# Altium PCB Driver.PcbDoc
Units mm, origin at the board's own origin, x right, y up, seen from the top; angles counter-clockwise.
Board outline 110.25 x 100.25 mm, 2 copper layers (Top Layer, Bottom Layer), stack 1.371 mm thick; 109 components, 30 nets, 264 pads, 40 vias.
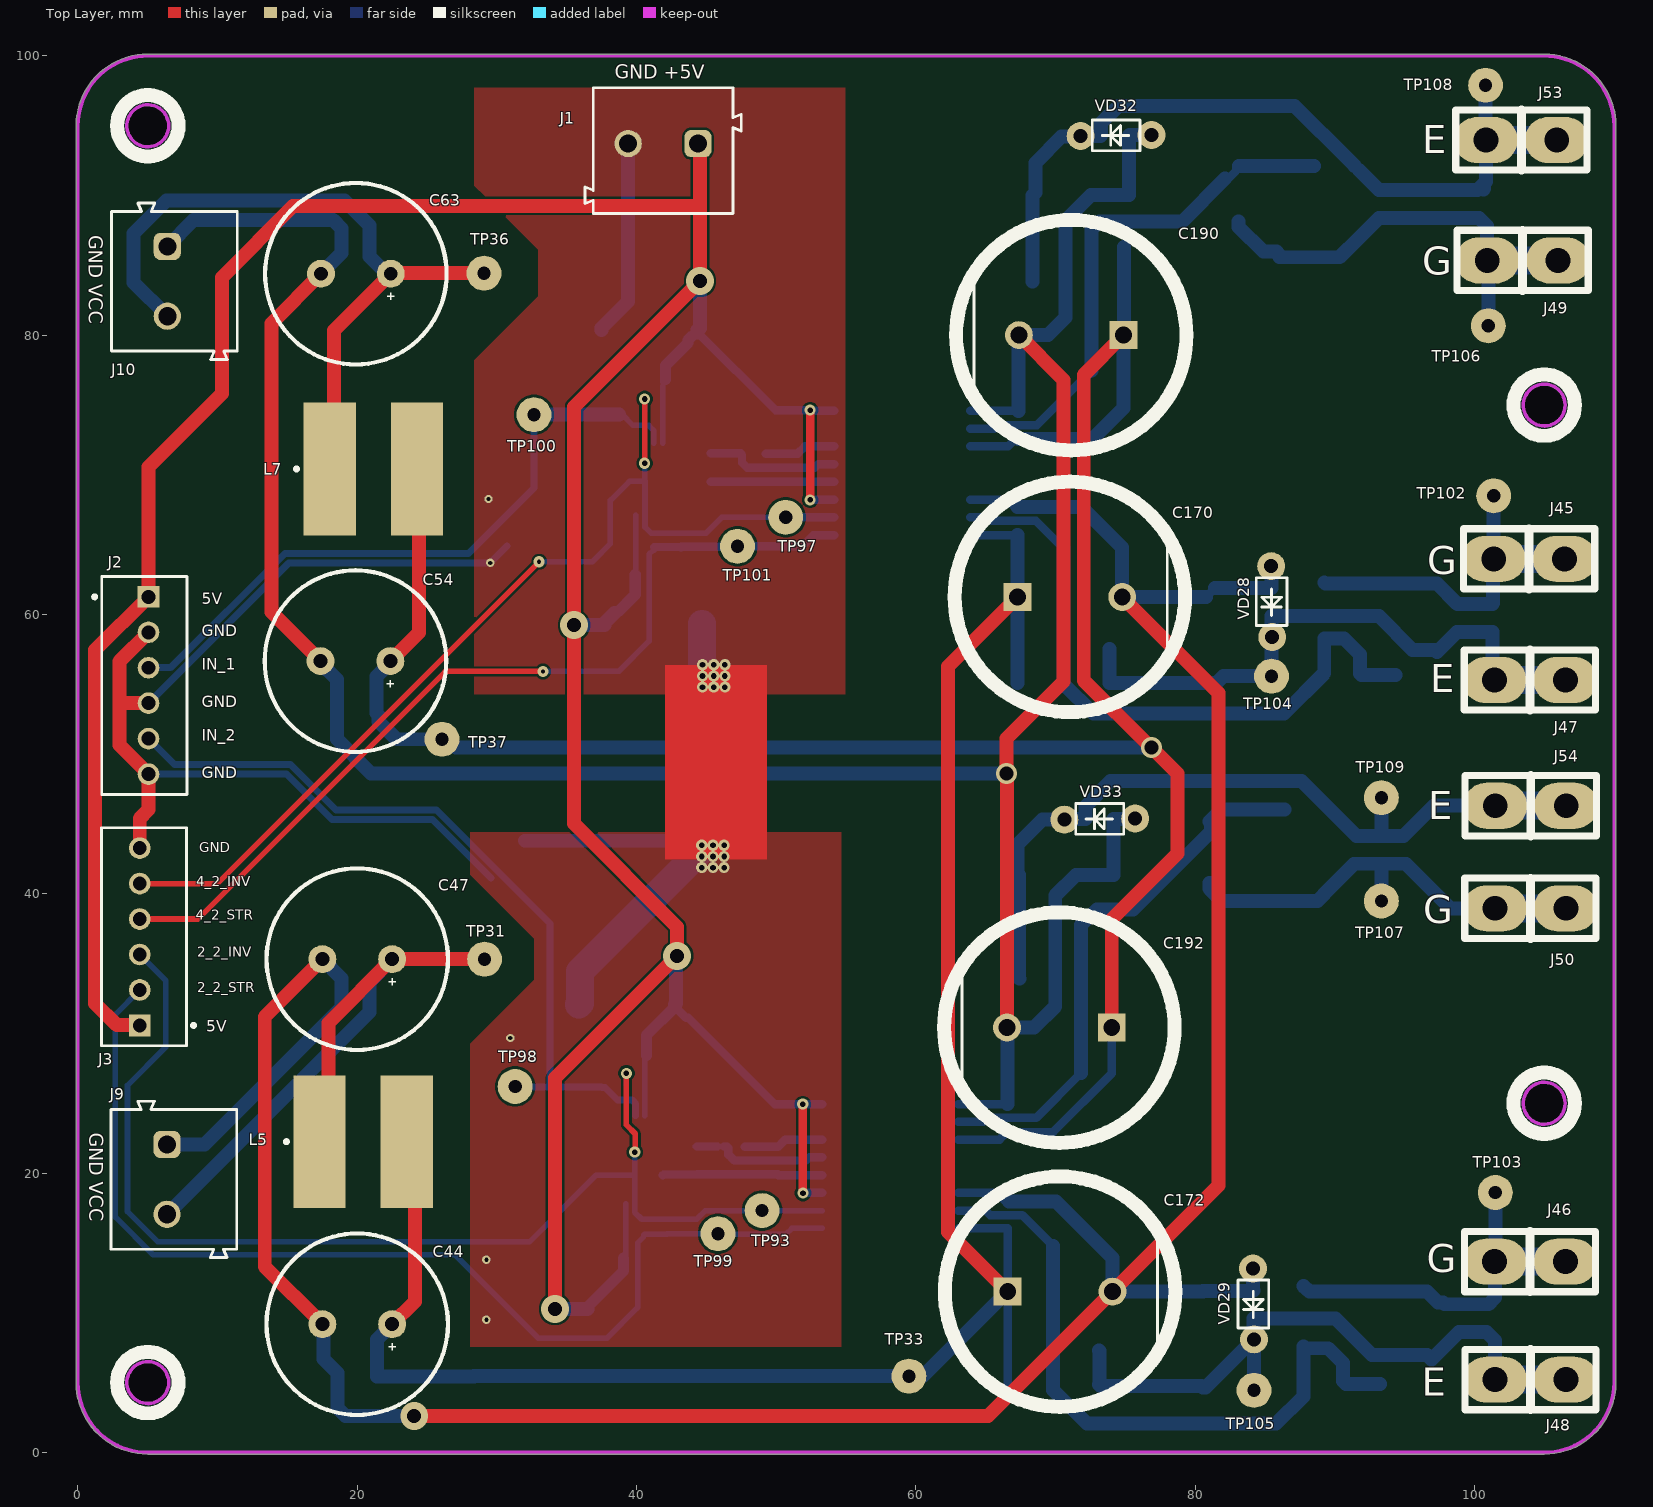
[diagram p0: Top Layer view]
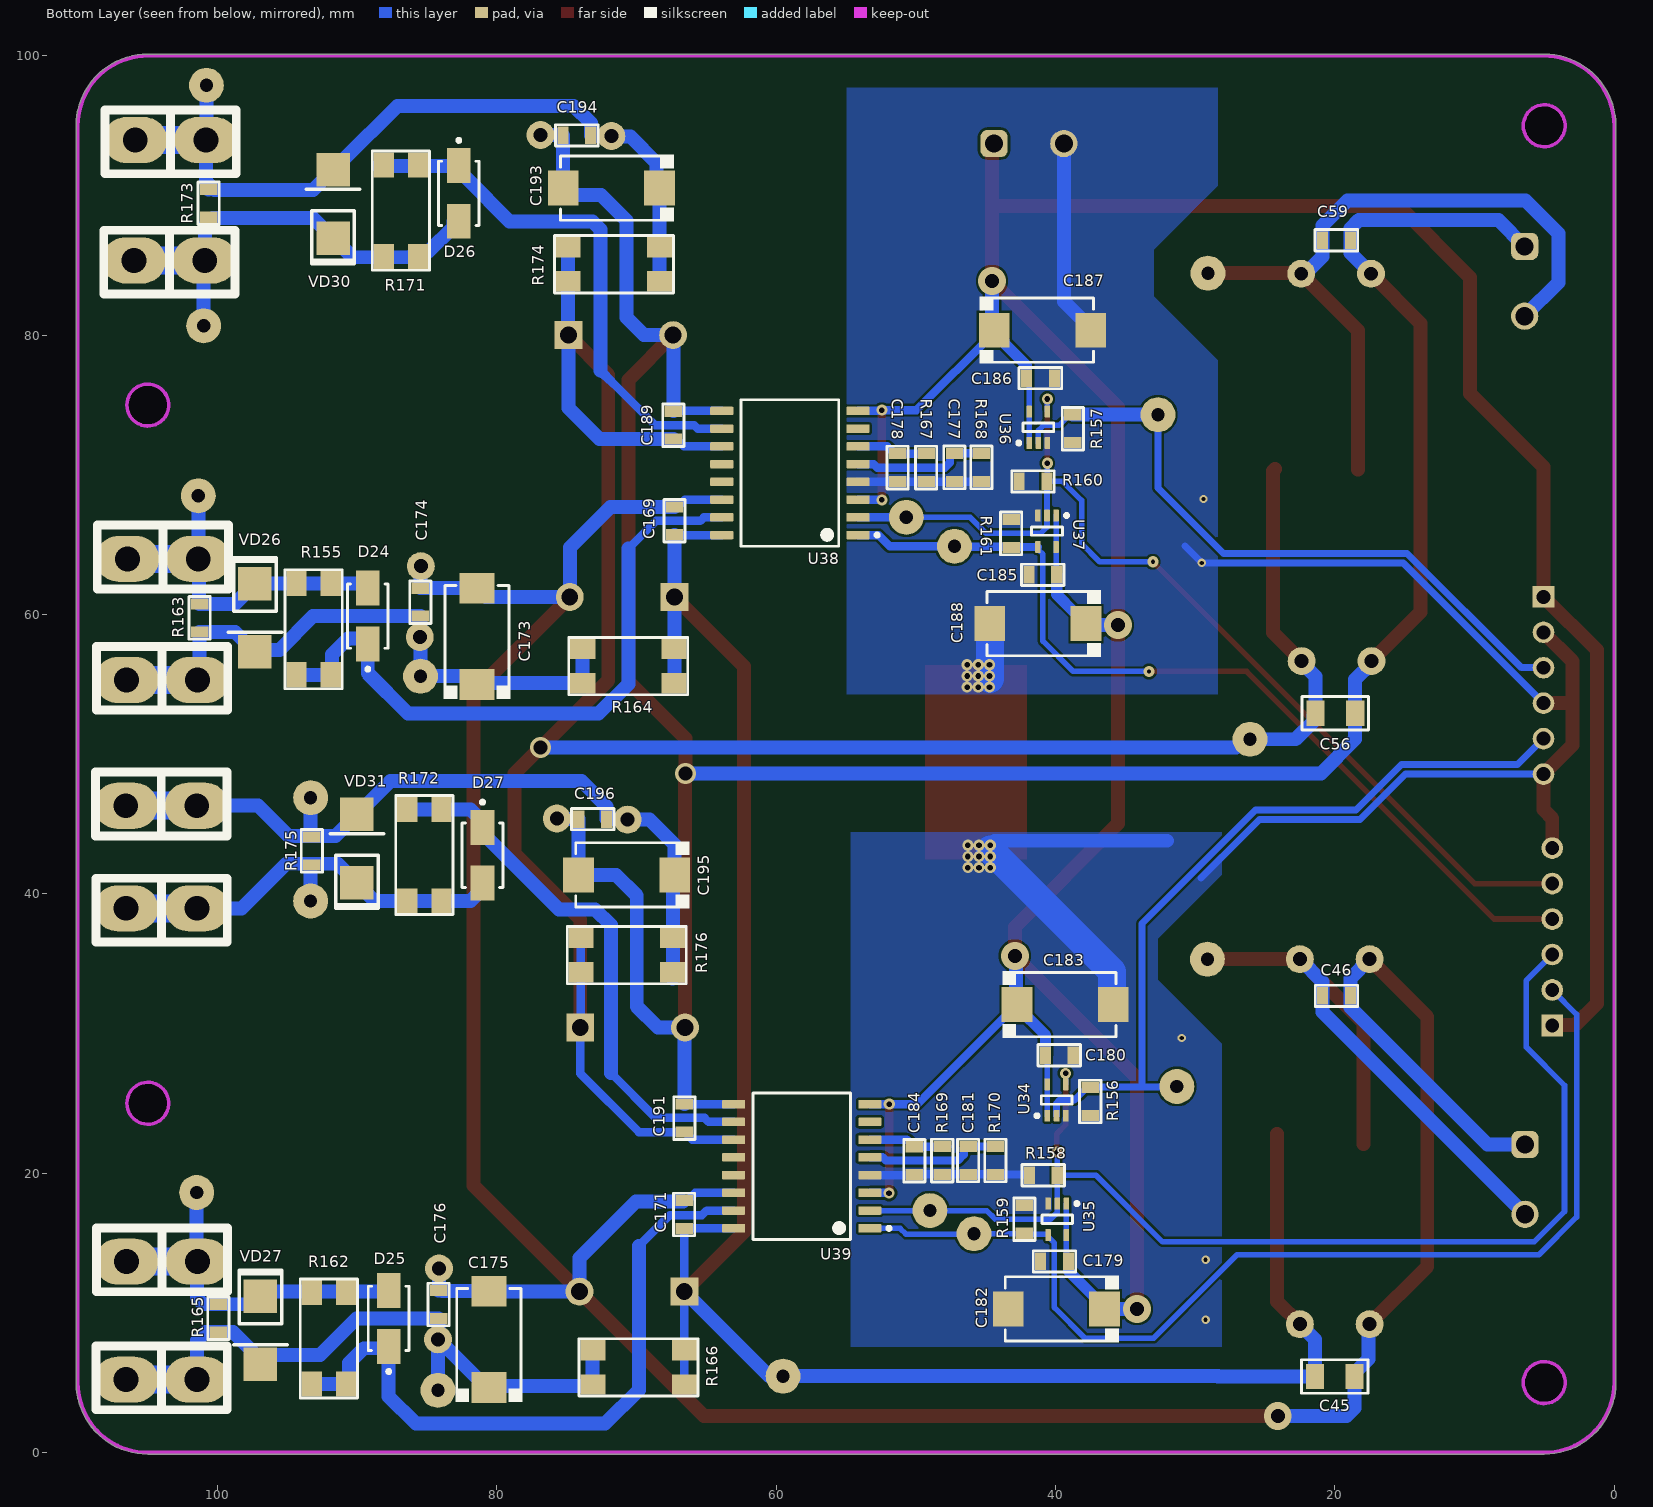
[diagram p1: Bottom Layer view, seen from below]
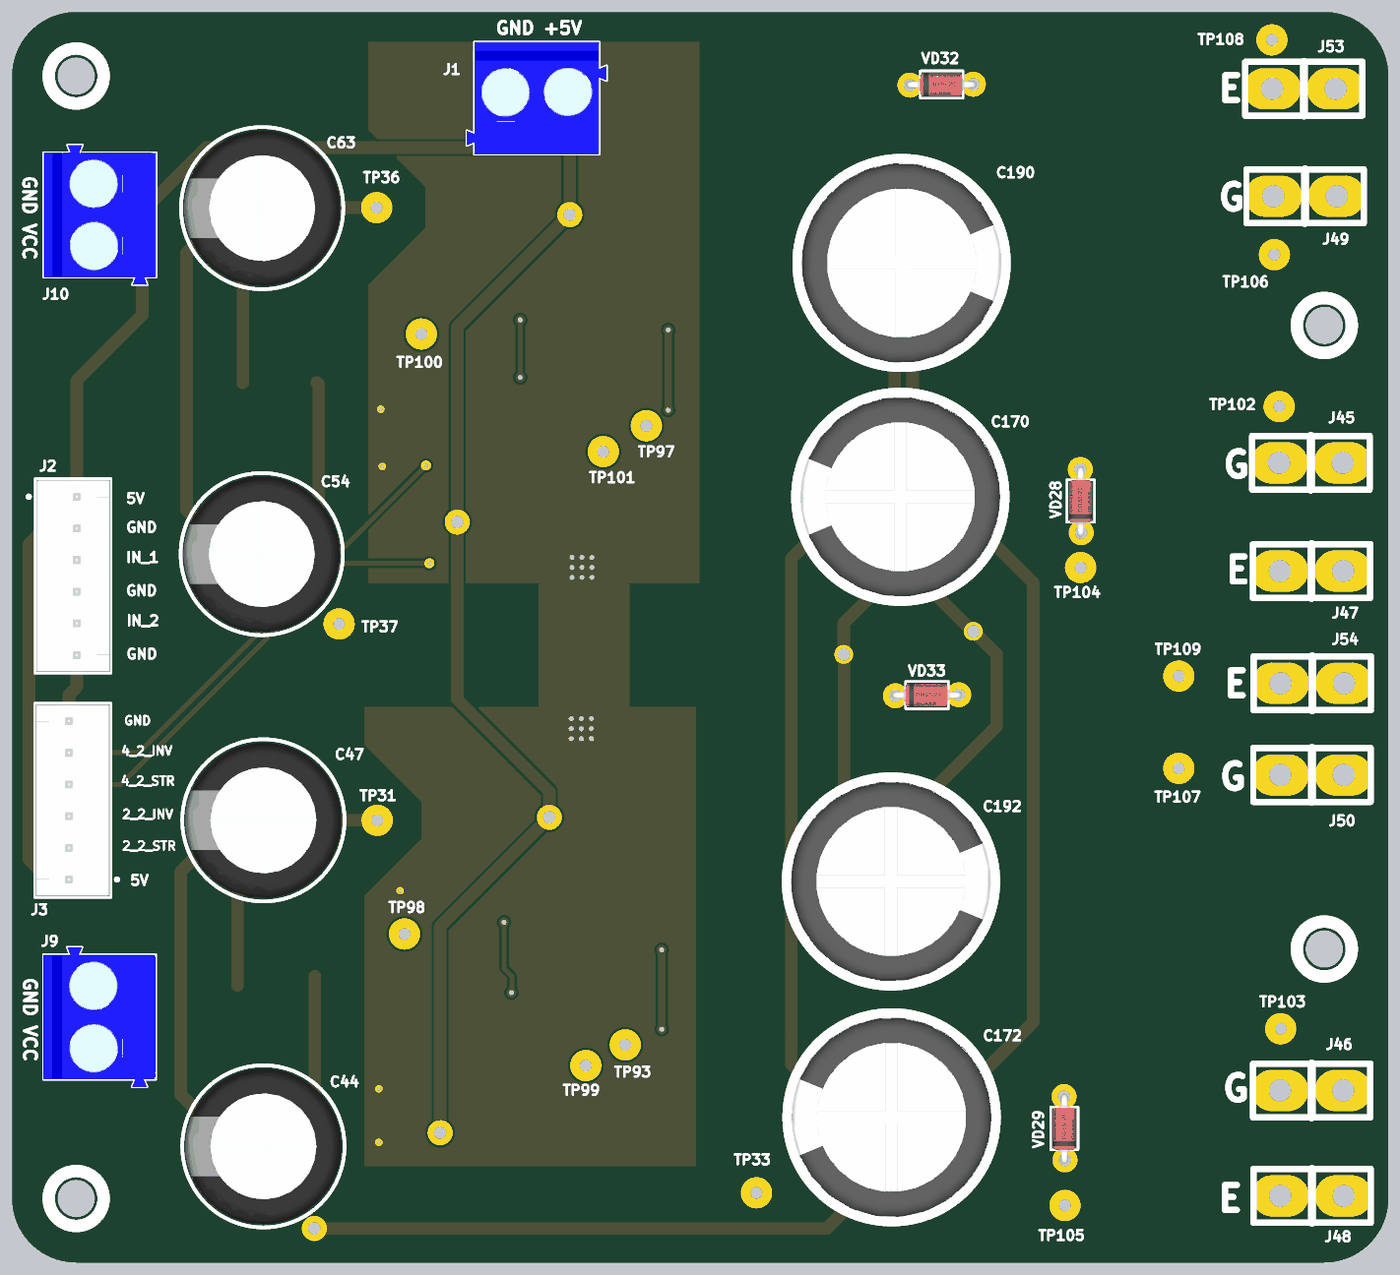
[diagram p2: 3D render of the assembled board from above, using the file's embedded part models]
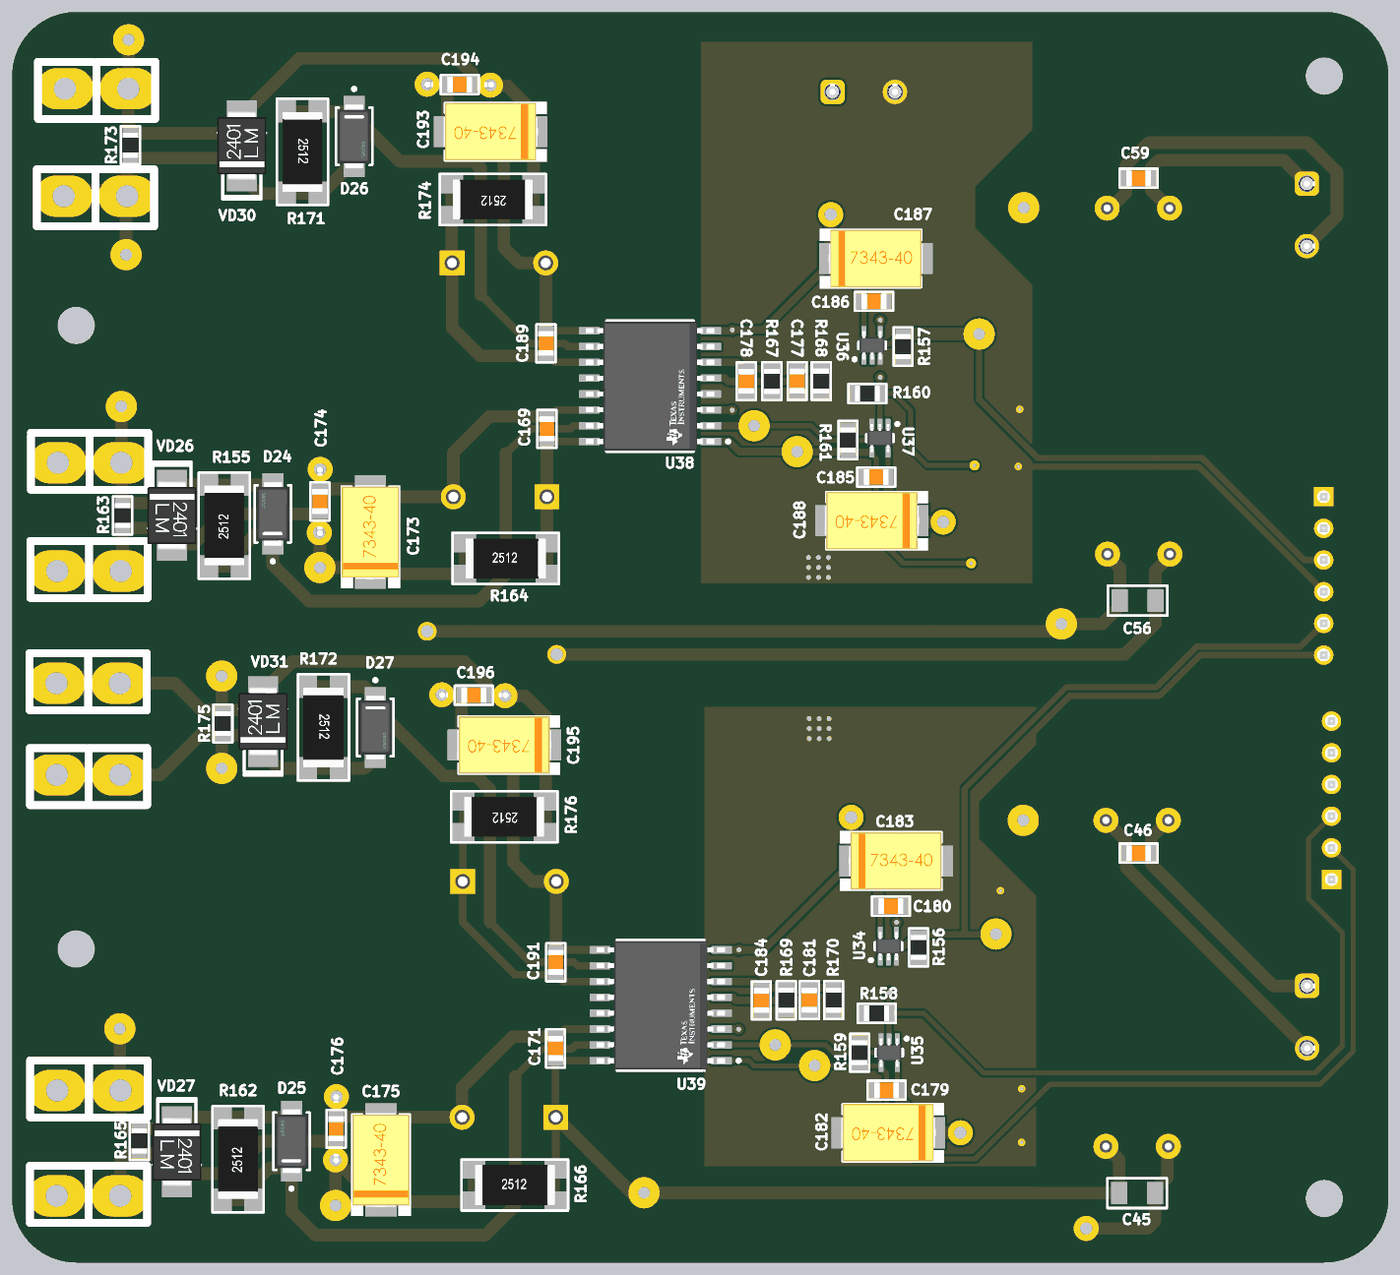
[diagram p3: 3D render of the assembled board from below, using the file's embedded part models]

## Layer stack, top to bottom
Top Solder: solder mask 0.0102, Solder Resist, Dk 3.5
Top Layer: signal copper 0.0356
Dielectric 1: dielectric 1.3, FR-4, Dk 4.8
Bottom Layer: signal copper 0.0356
Bottom Solder: solder mask 0.0102, Solder Resist, Dk 3.5

## Board outline
5,-0.127 cw(c5,5) -0.127,5 -0.127,95.328 -0.113,95.387 cw(c5,95) 5,100.127 105,100.127 cw(c105,95) 110.127,95 110.127,5 110.127,4.998 cw(c105,5) 105,-0.127
cut-out: 103.5,25 ccw(c105,25) 105,23.5 ccw(c105,25) 106.5,25 ccw(c105,25) 105,26.5 ccw(c105,25)
cut-out: 103.5,75 ccw(c105,75) 105,73.5 ccw(c105,75) 106.5,75 ccw(c105,75) 105,76.5 ccw(c105,75)
cut-out: 5,3.5 cw(c5,5) 3.5,5 cw(c5,5) 5,6.5 cw(c5,5) 6.5,5 cw(c5,5)
cut-out: 5,93.5 cw(c5,95) 3.5,95 cw(c5,95) 5,96.5 cw(c5,95) 6.5,95 cw(c5,95)

## Design rules (kind name [scope] priority, off if disabled: settings)
Clearance HV [InNetClass('All Nets') vs InNetClass('HV')] p1: gap=0.2 ignorepadtopadclearanceinfootprint=TRUE except(0: Text-Text Text-Hole; 0.4: THPad-THPad THPad-Via THPad-Fill THPad-Poly THPad-Region THPad-Text THPad-Hole Via-Via Via-Fill Via-Poly Via-Region Via-Text Via-Hole; 0.5: SMDPad-SMDPad SMDPad-THPad SMDPad-Via SMDPad-Fill SMDPad-Poly SMDPad-Region SMDPad-Text SMDPad-Hole Fill-Fill Fill-Poly Fill-Region Fill-Text Fill-Hole Poly-Poly Poly-Region Poly-Text Poly-Hole Region-Region Region-Text Region-Hole)
Clearance Clearance_1 [All] p2: gap=0.18 ignorepadtopadclearanceinfootprint=TRUE
Clearance GND [InNet('GND')] p3: gap=0.4 ignorepadtopadclearanceinfootprint=TRUE except(0.3: Text-Text Text-Hole)
ComponentClearance [All] p1: gap=-2.254 collisioncheckmode=3 verticalgap=0.254 showdistances=FALSE
DiffPairsRouting [All] p1: maxlimit=0.254 minlimit=0.1 mostfreqgap=0.254 toplayer_minwidth=0.3 toplayer_maxwidth=2 toplayer_prefwidth=0.3 bottomlayer_minwidth=0.3 bottomlayer_maxwidth=2 bottomlayer_prefwidth=0.3 maxuncoupledlength=12.7
Height [All] p1: minheight=0 maxheight=55.4 prefheight=12.7
HoleSize [All] p1: absolutevalues=TRUE maxlimit=5 minlimit=0.025 maxpercent=80.000 minpercent=20.000
HoleToHoleClearance [All] p1: gap=0 allowstackedmicrovias=TRUE
LayerPairs [All] p1 off: enforce=TRUE
MinimumSolderMaskSliver [All] p1: minsoldermaskwidth=0.01
PlaneClearance [All] p1: clearance=0.4
PlaneConnect [All] p1: planeconnectstyle=Direct reliefexpansion=0.508 reliefentries=4 reliefconductorwidth=0.254 reliefairgap=0.254
PolygonConnect [All] p1: connectstyle=Direct reliefconductorwidth=0.254 reliefentries=4 polygonreliefangle="90 Angle" airgapwidth=0.254
RoutingCorners [All] p1: cornerstyle=45-Degree minsetback=0.2 maxsetback=0.2
RoutingVias [All] p1: holewidth=0.4 width=0.8 viastyle="Through Hole" minholewidth=0.254 minwidth=0.5 maxholewidth=0.75 maxwidth=1.5
ShortCircuit [All] p1: allowed=TRUE
SilkToSilkClearance [All] p1 off: silktosilkclearance=0.01
SilkToSolderMaskClearance [All] p1: minsilkscreentomaskgap=0 clearancetoexposedcopper=FALSE
SolderMaskExpansion [All] p1: expansion=0 istentingtop=FALSE
UnRoutedNet [All] p1: checkbadconnections=TRUE
Width [All] p1: maxlimit=10 minlimit=0.254 preferedwidth=2
16 further rules are at their usual default settings.

## Components (designator, comment, footprint, x,y, rotation, side; value= is the part's Value field where it differs from the comment)
C44 "" CAPPOL-12x25 20,9.18 r180 top
C45 "1000pF" CAP-1206 20,5.43 r0 bottom
C46 "220pF" CAP-0805 19.874,32.694 r0 bottom
C47 "" CAPPOL-12x25 20,35.32 r180 top
C54 "" CAPPOL-12x25 19.87,56.665 r180 top
C56 "1000pF" CAP-1206 19.96,52.935 r0 bottom
C59 "220pF" CAP-0805 19.88,86.805 r0 bottom
C63 "" CAPPOL-12x25 19.9,84.405 r180 top
C169 "CAP-NON-POLAR" CAP-0805 67.281,66.712 r270 bottom
C170 "CAP-POLAR" CAPPOL-16x25 71.031,61.261 r0 top locked
C171 "CAP-NON-POLAR" CAP-0805 66.59,17.032 r270 bottom
C172 "CAP-POLAR" CAPPOL-16x25 70.33,11.512 r0 top locked
C173 "CAP-POLAR" CAP-TAN-D 81.423,58.436 r90 bottom
C174 "CAP-NON-POLAR" CAP-0805 85.473,60.886 r270 bottom
C175 "CAP-POLAR" CAP-TAN-D 80.58,8.092 r90 bottom
C176 "CAP-NON-POLAR" CAP-0805 84.17,10.592 r270 bottom
C177 "CAP-NON-POLAR" CAP-0805 47.231,70.538 r90 bottom
C178 "CAP-NON-POLAR" CAP-0805 51.306,70.522 r90 bottom
C179 "CAP-NON-POLAR" CAP-0805 40.07,13.683 r180 bottom
C180 "CAP-NON-POLAR" CAP-0805 39.725,28.438 r0 bottom
C181 "CAP-NON-POLAR" CAP-0805 46.255,20.902 r90 bottom
C182 "CAP-POLAR" CAP-TAN-D 39.94,10.272 r0 bottom
C183 "CAP-POLAR" CAP-TAN-D 39.31,32.062 r180 bottom
C184 "CAP-NON-POLAR" CAP-0805 50.11,20.882 r90 bottom
C185 "CAP-NON-POLAR" CAP-0805 40.906,62.846 r180 bottom
C186 "CAP-NON-POLAR" CAP-0805 41.079,76.934 r0 bottom
C187 "CAP-POLAR" CAP-TAN-D 40.929,80.361 r180 bottom
C188 "CAP-POLAR" CAP-TAN-D 41.256,59.346 r0 bottom
C189 "CAP-NON-POLAR" CAP-0805 67.356,73.56 r270 bottom
C190 "CAP-POLAR" CAPPOL-16x25 71.131,80.011 r180 top locked
C191 "CAP-NON-POLAR" CAP-0805 66.57,23.937 r270 bottom
C192 "CAP-POLAR" CAPPOL-16x25 70.28,30.422 r180 top locked
C193 "CAP-POLAR" CAP-TAN-D 71.803,90.534 r0 bottom
C194 "CAP-NON-POLAR" CAP-0805 74.273,94.314 r180 bottom
C195 "CAP-POLAR" CAP-TAN-D 70.71,41.362 r0 bottom
C196 "CAP-NON-POLAR" CAP-0805 73.14,45.352 r180 bottom
D24 "US1G" US1G_SMA 89.248,59.886 r90 bottom
D25 "US1G" US1G_SMA 87.746,9.592 r90 bottom
D26 "US1G" US1G_SMA 82.731,90.161 r270 bottom
D27 "US1G" US1G_SMA 81.03,42.762 r270 bottom
J1 "691101710002" 691101710002 41.9,93.225 r180 top
J2 "" Sullins_SWR25X-NRTC-S06-ST-BA_MFG 4.75,54.92 r270 top
J3 "" Sullins_SWR25X-NRTC-S06-ST-BA_MFG 4.725,36.925 r90 top
J9 "691101710002" 691101710002 6.875,19.55 r270 top
J10 "691101710002" 691101710002 6.9,83.865 r270 top
J45 "G" Klema_PCB_15A 103.923,63.986 r180 top
J46 "G" Klema_PCB_15A 103.985,13.661 r180 top
J47 "E" Klema_PCB_15A 103.973,55.311 r180 top
J48 "E" Klema_PCB_15A 104.012,5.211 r180 top
J49 "G" Klema_PCB_15A 103.456,85.361 r0 top
J50 "G" Klema_PCB_15A 104.01,38.961 r0 top
J53 "E" Klema_PCB_15A 103.361,93.98 r0 top
J54 "E" Klema_PCB_15A 104.035,46.311 r180 top
L5 "744776227" WE-PD2_1054 1290.425,1292.25 r0 top
L7 "744776227" WE-PD2_1054 1291.15,1340.425 r0 top
R155 "10" RES-2512 93.123,58.961 r90 bottom
R156 "10K" RES-0805 37.51,25.133 r90 bottom
R157 "10K" RES-0805 38.754,73.311 r90 bottom
R158 "10K" RES-0805 40.87,19.845 r180 bottom
R159 "10K" RES-0805 42.23,16.692 r270 bottom
R160 "10K" RES-0805 41.606,69.538 r180 bottom
R161 "10K" RES-0805 43.169,65.812 r270 bottom
R162 "10" RES-2512 92.031,8.167 r90 bottom
R163 "10K" RES-0805 101.283,59.761 r90 bottom
R164 "1K" RES-2512 70.581,56.311 r180 bottom
R165 "10K" RES-0805 99.941,9.607 r90 bottom
R166 "1K" RES-2512 69.84,6.082 r180 bottom
R167 "100K" RES-0805 49.256,70.522 r90 bottom
R168 "10K" RES-0805 45.306,70.538 r90 bottom
R169 "100K*" RES-0805 48.106,20.897 r90 bottom
R170 "10K" RES-0805 44.308,20.903 r90 bottom
R171 "10" RES-2512 86.881,88.911 r270 bottom
R172 "10" RES-2512 85.19,42.762 r270 bottom
R173 "10K" RES-0805 100.65,89.45 r270 bottom
R174 "1K" RES-2512 71.631,85.086 r0 bottom
R175 "10K" RES-0805 93.25,43.075 r270 bottom
R176 "1K" RES-2512 70.71,35.611 r0 bottom
TP31 "Test_Point_PCB" Test_Point 29.118,35.32 r90 top
TP33 "Test_Point_PCB" Test_Point 59.506,5.46 r90 top
TP36 "Test_Point_PCB" Test_Point 29.08,84.445 r90 top
TP37 "Test_Point_PCB" Test_Point 26.067,51.069 r90 top
TP93 "Test_Point_PCB" Test_Point 48.99,17.317 r90 top
TP97 "Test_Point_PCB" Test_Point 50.681,66.961 r90 top
TP98 "Test_Point_PCB" Test_Point 31.305,26.206 r90 top
TP99 "Test_Point_PCB" Test_Point 45.832,15.661 r90 top
TP100 "Test_Point_PCB" Test_Point 32.656,74.311 r90 top
TP101 "Test_Point_PCB" Test_Point 47.231,64.886 r90 top
TP102 "Test_Point_PCB" Test_Point 101.383,68.5 r90 top
TP103 "Test_Point_PCB" Test_Point 101.503,18.609 r90 top
TP104 "Test_Point_PCB" Test_Point 85.473,55.586 r90 top
TP105 "Test_Point_PCB" Test_Point 84.22,4.442 r90 top
TP106 "Test_Point_PCB" Test_Point 101,80.675 r90 top
TP107 "Test_Point_PCB" Test_Point 93.34,39.487 r90 top
TP108 "Test_Point_PCB" Test_Point 100.8,97.9 r90 top
TP109 "Test_Point_PCB" Test_Point 93.34,46.883 r90 top
U34 "74LVC1G14" SOT23-5_N 39.925,25.232 r90 bottom
U35 "74LVC1G14" SOT23-5_N 39.87,16.692 r270 bottom
U36 "74LVC1G14" SOT23-5_N 41.229,73.411 r90 bottom
U37 "74LVC1G14" SOT23-5_N 40.606,65.971 r270 bottom
U38 "UCC21520DW" FP-DW0016B-MFG 59.021,70.136 r0 bottom
U39 "UCC21520DW" FP-DW0016B-MFG 58.17,20.492 r0 bottom
VD26 "SMBJ18CA" DO-214AA 97.323,57.711 r90 bottom
VD27 "SMBJ18CA" DO-214AA 96.931,6.686 r90 bottom
VD28 "5.1V" DO-35 85.473,60.886 r90 top
VD29 "5.1V" DO-35 84.17,10.592 r90 top
VD30 "SMBJ18CA" DO-214AA 91.731,91.461 r270 bottom
VD31 "SMBJ18CA" DO-214AA 90.02,45.302 r270 bottom
VD32 "5.1V" DO-35 74.303,94.314 r0 top
VD33 "5.1V" DO-35 73.135,45.362 r0 top

## Footprints (in the part's own frame and the unit in brackets; to place one, negate y for a bottom-side part, rotate by r counter-clockwise, add the part's x,y. Pads: shape width x height; smd on the part's side, far side on the other; paste and mask are expansions set on the pad)
691101710002 [mm] "5,00mm - modular - blue - Horizontal entry with pressure clamp - 12,6mm height - 02p"
  rrect50% 1.95x1.95 hole 1.3: 1(-2.5,-0.5)
  round 1.95 hole 1.3: 2(2.5,-0.5)
  silkscreen extent -5.6,-4.5 5.6,4.5, body extent -5.6,-4.5 5.6,4.5, height 12.65
CAP-0805 [mm]
  rect 0.8x1.25 smd mask+0.015: 1(-1,0) 2(1,0)
  silkscreen extent -1.52,-0.76 1.52,0.76, body extent -1,-0.62 1,0.63, height 0.8
CAP-1206 [mm]
  rect 1.3x1.8 smd: 1(-1.425,0) 2(1.425,0)
  silkscreen extent -2.37,-1.2 2.37,1.2, body extent -1.68,-0.87 1.67,0.87, height 0.95
CAP-TAN-D [mm]
  rect 2.2x2.5 smd: 1(-3.45,0) 2(3.45,0)
  silkscreen extent -4.5,-2.4 3.65,2.4, body extent -3.8,-2.3 3.8,2.3, height 4
CAPPOL-12x25 [mm]
  round 2 hole 1: 1(-2.5,0) 2(2.5,0)
  silkscreen extent -6.5,-6.5 6.5,6.5, body extent -6.25,-6.25 6.25,6.25, height 25
CAPPOL-16x25 [mm]
  rect 2x2 hole 1.2 paste-2539.97 mask+0: 1(-3.75,0)
  round 2 hole 1.2 paste-2539.97 mask+0: 2(3.75,0)
  silkscreen extent -8.25,-8.25 8.25,8.25, body extent -8.35,-8.35 8.35,8.35, height 0.25
DO-35 [mm]
  round 2 hole 1: 1(-2.5,-0.05) 2(2.575,0.025)
  silkscreen extent -1.68,-1.1 1.75,1.1, body extent -2.82,-0.9 2.82,0.9, height 1.82
DO-214AA [mm]
  rect 2.4x2.4 smd: 1(-0.381,0) 2(4.5,0)
  silkscreen extent 1.02,-1.91 6.35,1.91, body extent -0.75,-1.97 4.85,1.97, height 2.65
FP-DW0016B-MFG [mm]
  rrect17% 1.65x0.6 smd paste+0 mask+0: 1(-4.875,4.445) 2(-4.875,3.175) 3(-4.875,1.905) 4(-4.875,0.635) 5(-4.875,-0.635) 6(-4.875,-1.905) 7(-4.875,-3.175) 8(-4.875,-4.445) 9(4.875,-4.445) 10(4.875,-3.175) 11(4.875,-1.905) 12(4.875,-0.635) 13(4.875,0.635) 14(4.875,1.905) 15(4.875,3.175) 16(4.875,4.445)
  silkscreen extent -6.37,-5.25 3.5,5.25, body extent -5.15,-5.15 5.15,5.15, height 2.65
Klema_PCB_15A [mil]
  oval 180x130 hole 70: 1(-100,0) 1(100,0)
  silkscreen extent -185,-85 185,85, body extent -161,-16 161,16, height 505
RES-0805 [mm]
  rect 0.8x1.25 smd mask+0.015: 1(-1,0) 2(1,0)
  silkscreen extent -1.52,-0.76 1.52,0.76, body extent -1,-0.62 1,0.63, height 0.6
RES-2512 [mm]
  rect 1.8x1.45 smd: 1(-3.275,-1.225) 1(-3.275,1.225) 2(3.275,-1.225) 2(3.275,1.225)
  silkscreen extent -4.28,-2.05 4.25,2.05, body extent -3.2,-1.6 3.2,1.6, height 0.6
SOT23-5_N [mm]
  rrect25% 0.85x0.4 smd: 1(-1.125,0.65) 2(-1.125,0) 3(-1.125,-0.65) 4(1.125,-0.65) 5(1.125,0.65)
  silkscreen extent -1.25,-1.1 0.3,1.53, body extent -1.14,-1 1.14,1, height 0.94
Sullins_SWR25X-NRTC-S06-ST-BA_MFG [mm]
  rect 1.55x1.55 hole 1 paste-2539.97 mask+0: 1(-6.35,0.3)
  round 1.55 hole 1 paste-2539.97 mask+0: 2(-3.81,0.3) 3(-1.27,0.3) 4(1.27,0.3) 5(3.81,0.3) 6(6.35,0.3)
  silkscreen extent -7.8,-3.67 7.8,3.05, body extent -7.9,-3.15 7.9,3.15, height 0.25
Test_Point [mm]
  round 2.5 hole 0.95: 1(0,0)
US1G_SMA [mm]
  rect 2.5x1.7 smd paste+0 mask+0: 1(-2,0) 2(2,0)
  silkscreen extent -3.92,-1.46 2.3,1.46, body extent -2.6,-1.3 2.6,1.3, height 2.4
WE-PD2_1054 [mm] "SMD Power Inductor, 2-Leads, body 10x9mm"
  rect 3.75x9.5 smd: 1(-1273.125,-1270) 2(-1266.875,-1270)
  silkscreen extent -1275.62,-1270.12 -1275.37,-1269.88, body extent -1275.04,-1274.5 -1264.96,-1265.5, height 5.43

## Part data
C44 C47 C54 C63: library part CAP-POLAR
C45 C46 C56 C59: library part CAP-NON-POLAR
J1 J9 J10: "WR-TBL Series 101 Horizontal Entry Modular, THT, pitch 5mm, 2p", Manufacturer="Wurth Elektronik", Operating Temperature Max=105°C, Operating Temperature Min=-40°C, Rated Current=16A, Working Voltage=250V, Application="Pressure Clamp", Category="Terminal Blocks", ComponentLink1Description="Website Link", ComponentLink1URL=https://www.we-online.com/redexpert/article/691101710002?ad, ComponentLink2Description="Datasheet Link", ComponentLink2URL=https://www.we-online.com/redexpert/spec/691101710002?ad, Manufacturer Part Number=691101710002, Match Code=WR-TBL, Modularity=Yes, Mount="Through Hole", Number of Pins=2, Number of Rows=1, Orientation=Horizontal, Packaging=Box, Pitch=5mm
J2 J3: library part SWR25X-NRTC-S06-ST-BA
J45 J46 J47 J48 J49 J50 J53 J54: library part Klema_15_A
L5 L7: library part CMP-0227-00501-2, Ambient Temperature Range High=85°C, Ambient Temperature Range Low=-40°C, Current Rating=620mA, DC Resistance (DCR)=500mΩ, Inductance=270µH, Max Operating Temperature=125°C, Self Resonant Frequency=4MHz, Height=5.4mm, Length=9mm, Min Operating Temperature=-40°C, NexarPartId=24533346, Packaging=Digi-Reel®, RoHS=Compliant, Width=10mm
R155 R156 R157 R158 R159 R160 R161 R162 R163 R164 R165 R166 R167 R168 R170 R171 R172 R173 R174 R175 R176: library part RES-CONST
R169: library part RES-CONST, "100K"
TP31 TP33 TP36 TP37 TP93 TP97 TP98 TP99 TP100 TP101 TP102 TP103 TP104 TP105 TP106 TP107 TP108 TP109: library part TP_PCB?, "Test_Point"
VD26 VD27 VD30 VD31: library part Suppressor
VD28 VD29 VD32 VD33: library part ZENER

## Via types
v1: diameter 0.8, hole 0.4, Top Layer to Bottom Layer, tented both sides, 26 vias
v2: diameter 0.6, hole 0.3, Top Layer to Bottom Layer, 5 vias
v3: diameter 2, hole 1, Top Layer to Bottom Layer, 5 vias
v4: diameter 0.8, hole 0.3, Top Layer to Bottom Layer, 2 vias
v5: diameter 1.5, hole 1, Top Layer to Bottom Layer, 2 vias

## Nets (pads, with @x,y where several pads share a name; then routed paths per layer and width w, separated by ;. In a path a pad name is that pad's centre, name@x,y a point inside that pad or via, vN(x,y) a via of type N, cw(c..) or ccw(c..) an arc to the next point about the centre after c; other vN are vias at no path point)
+5: C179.2 C180.2 C182.1 C183.1 C185.2 C186.2 C187.1 C188.1 J1.1 J2.1 J3.1 U34.1 U34.5 U35.1 U35.5 U36.1 U36.5 U37.1 U37.5 U38.3 U38.8 U39.3 U39.8 | length 279
  Top Layer w0.6: v1(51.898,24.937) 51.909,24.927 51.909,18.578 v1(51.92,18.567) ; v1(52.431,68.211) v1(52.431,74.636)
  Top Layer w1: J3.1 4.401,30.599 2.777,30.599 1.225,32.151 1.225,57.445 J2.1 5.05,70.575 10.3,75.825 10.3,84.15 15.415,89.265 44.546,89.265 ; v3(34.16,10.272) 34.16,26.811 v3(42.91,35.561) 42.91,37.64 35.531,45.019 v3(35.531,59.236) 35.531,74.872 v3(44.546,83.886) 44.546,89.265 ; J1.1 44.546,93.579 44.546,89.265
  Bottom Layer w0.4: C188.1@37.696,59.236 C188.1 ; C179.2@39.22,14.058 U35.5 U35.1 ; C185.2 39.956,62.896 U37.5 U37.1 ; U34.1 U34.5 C180.2@40.575,28.513 ; U36.1 U36.5 C186.2@41.879,76.386 ; C186.2@41.879,76.635 C186.2@42.079,76.835 ; C186.2 42.279,77.133 C186.2@42.279,77.409 ; C187.1 C187.1@44.546,80.528
  Bottom Layer w0.6: C183.1 42.76,31.912 43.56,31.112 43.71,31.112 49.885,24.937 v1(51.898,24.937) U39.8 ; C187.1@44.379,80.211 49.954,74.636 52.485,74.636 52.54,74.581 U38.8 ; v1(51.92,18.567) 51.94,18.587 U39.3 ; v1(52.431,68.211) 52.451,68.231 U38.3
  Bottom Layer w0.8: C182.1 36.49,10.422 39.07,13.002 C179.2 C179.2@39.07,13.908 ; C188.1 37.806,59.496 38.506,60.196 38.656,60.196 39.906,61.446 C185.2 ; C180.2 40.725,29.878 C183.1@42.76,31.912 ; C186.2@42.079,76.835 42.079,77.844 43.679,79.444 43.679,79.661 C187.1@43.963,79.945
  Bottom Layer w1: v3(34.16,10.272) C182.1 ; v3(35.531,59.236) C188.1@37.696,59.236 ; C188.1@37.806,59.496 C188.1@38.406,60.096 ; C183.1 42.835,32.137 42.835,35.486 v3(42.91,35.561) ; C187.1@44.379,80.211 C187.1 ; C187.1@44.546,80.528 v3(44.546,83.886)
+24V_1: C44.1 C45.2 C169.2 C170.1 C171.2 C172.1 L5.2 R164.2 R166.2 TP33.1 U38.16 U39.16 | length 148.5
  Top Layer w1: C44.1 24.125,10.805 L5.2@24.125,22.816 ; C172.1 62.3,15.792 62.3,56.279 C170.1
  Bottom Layer w0.6: U39.16@63.053,16.04 66.582,16.04 C171.2 ; U38.16 67.26,65.691 C169.2 ; R166.2@66.565,4.857 66.573,4.865 66.573,7.307 C172.1@66.573,11.505 ; C172.1 66.585,11.517 C171.2@66.585,16.028 ; R164.2@67.281,55.111 R164.2@67.306,55.086
  Bottom Layer w1: C44.1 22.5,9.169 21.425,8.094 C45.2 21.44,5.445 28.355,5.445 28.37,5.46 60.528,5.46 C172.1 ; R164.2@67.281,55.111 C170.1 C169.2
+24V_2: C54.1 C56.2 C189.2 C190.1 C191.2 C192.1 L7.2 R174.2 R176.2 TP37.1 U38.11 U39.11 | length 177
  Top Layer w1: C54.1 24.425,58.72 24.425,70.275 L7.2 ; C192.1 74.03,38.155 78.75,42.875 78.75,48.6 v5(76.875,50.475) 76.825,50.475 72.025,55.275 72.025,77.154 C190.1
  Bottom Layer w0.6: U39.11 66.005,22.397 66.545,22.937 C191.2 69.835,22.937 74.03,27.132 C192.1 74.008,30.445 74.008,36.345 R176.2@73.985,36.367 ; U38.11 66.612,72.041 67.131,72.56 C189.2 ; C190.1 C190.1@74.906,80.036
  Bottom Layer w1: C54.1 22.37,56.564 21.385,55.579 C56.2 21.535,52.785 21.535,52.338 22.803,51.069 26.473,51.069 27.067,50.475 v5(76.875,50.475) ; C189.2 72.655,72.56 74.881,74.786 C190.1 ; C190.1@74.906,80.036 74.906,83.861 R174.2@74.906,86.311
GND: C177.1 C178.1 C179.1 C180.1 C181.1 C182.2 C183.2 C184.1 C185.1 C186.1 C187.2 C188.2 J1.2 J2.2 J2.4 J2.6 J3.6 R156.1 R157.1 R158.1 R159.1 R160.1 R161.1 R167.1 R168.1 R169.1 R170.1 U34.3 U35.3 U36.3 U37.3 U38.4 U39.4 | length 143.4
  Top Layer w1: J3.6 4.425,45.4 5.05,46.025 J2.6 2.975,50.645 2.975,53.65 ; J2.4 2.975,53.65 ; J2.2 2.975,56.655 2.975,53.65
  Bottom Layer w0.3: C188.2@44.7,59.34 C188.2 ; R168.1 R168.1@45.325,69.519
  Bottom Layer w0.5: J2.6 14.943,48.57 18.193,45.32 25.393,45.32 29.581,41.133 ; J2.4 15.095,63.695 v2(29.52,63.695) 30.729,64.904
  Bottom Layer w0.6: R158.1 41.927,19.903 R170.1 ; R170.1@44.308,19.915 C184.1@50.11,19.915 ; R168.1@45.325,69.519 C178.1@51.306,69.519 ; C184.1@50.135,19.857 U39.4 ; C178.1@51.327,69.501 U38.4
  Bottom Layer w1: 32.01,43.8 44.35,43.8 v1(44.675,43.475) ; C187.2 37.479,80.511 39.4,82.432 J1.2
  Bottom Layer w2: C183.2 35.96,32.162 35.96,34.435 v1@44.7,43.175 ; v1@44.7,55.375 C188.2@44.7,59.34
  other v1: 44.675,41.875 45.475,41.875 46.275,41.875 44.675,42.675 45.475,42.675 46.275,42.675 45.475,43.475 46.275,43.475 44.725,54.8 45.525,54.8 46.325,54.8 44.725,55.6 45.525,55.6 46.325,55.6 44.725,56.4 45.525,56.4 46.325,56.4
  other v2: 29.248,9.497 29.25,13.8 30.95,29.675 29.4,68.275
GND_-24V_1: C44.2 C45.1 C46.1 C47.2 C169.1 C170.2 C171.1 C172.2 C173.2 C174.1 C175.2 C176.1 J9.1 U38.14 U39.14 VD28.2 VD29.2 | length 227.1
  Top Layer w1: C44.2 13.375,13.305 13.375,31.195 C47.2 ; v3(24.08,2.6) 65.168,2.6 C172.2 81.675,19.107 81.675,54.367 C170.2
  Bottom Layer w0.6: U39.14 65.81,18.587 66.365,18.032 C171.1 C171.1@66.654,17.969 ; U38.14 66.537,68.231 67.056,67.712 C169.1 ; C172.2 C172.2@74.095,11.527 ; C175.2@80.565,11.527 C175.2 ; C173.2@80.798,61.261 C173.2 ; C176.1@83.895,11.542 83.945,11.592 C176.1 ; VD28.2 VD28.2@85.46,63.448 ; C174.1@85.46,61.898 C174.1
  Bottom Layer w1: J9.1 9.075,22.05 18.874,31.849 18.874,33.946 C47.2 ; C44.2@17.575,9.105 17.575,6.68 18.575,5.68 C45.1 18.575,3.186 19.161,2.6 v3(24.08,2.6) ; C171.1@66.654,17.969 70.029,17.969 74.08,13.917 C172.2 ; C169.1 71.88,67.712 74.781,64.811 C170.2 C173.2@80.798,61.261 ; C172.2@74.095,11.527 C175.2@80.565,11.527 ; C175.2 C176.1@83.895,11.542 ; C173.2 C174.1 ; VD29.2 84.157,13.155 84.157,11.605 C176.1 ; C174.1@85.46,61.898 VD28.2@85.46,63.448
GND_-24V_2: C54.2 C56.1 C59.1 C63.2 C189.1 C190.2 C191.1 C192.2 C193.2 C194.1 C195.2 C196.1 J10.1 U38.9 U39.9 VD32.2 VD33.2 | length 218.1
  Top Layer w1: C54.2 13.85,60.185 13.85,80.855 C63.2 ; C192.2 66.515,30.437 66.515,48.61 v5(66.5,48.625) 66.5,51.125 70.581,55.206 70.581,76.811 C190.2
  Bottom Layer w0.6: U39.9 66.55,24.937 C191.1 ; U38.9 67.335,74.581 C189.1 C189.1@67.369,74.572 ; C192.2 C192.2@66.55,30.402 ; C190.2@67.369,79.998 C190.2 ; C193.2@75.244,90.542 C193.2 ; C194.1 C194.1@75.285,94.327 ; VD32.2@76.865,94.327 VD32.2
  Bottom Layer w0.8: C195.2@74.14,41.382 C195.2 ; C196.1 C196.1@74.14,45.37 ; VD33.2@75.693,45.37 VD33.2
  Bottom Layer w1: J10.1 8.285,88.25 18.281,88.25 18.88,87.651 18.88,85.885 C63.2 ; C54.2 17.37,56.5 18.535,55.335 C56.1 18.535,51.071 20.981,48.625 v5(66.5,48.625) ; C192.2 68.47,30.422 69.985,31.937 69.985,39.887 71.46,41.362 C195.2 ; C191.1@66.55,24.937 C192.2@66.55,30.402 ; C189.1@67.369,74.572 C190.2@67.369,79.998 ; C190.2 69.481,80.011 70.731,81.261 70.731,88.232 72.535,90.036 C193.2@75.281,90.036 ; C195.2@74.14,41.382 C196.1 ; C196.1@74.14,45.37 VD33.2@75.693,45.37 ; C193.2@75.273,90.044 C194.1 ; C194.1@75.285,94.327 VD32.2@76.865,94.327
NetC46_2: C46.2 C47.1 J9.2 L5.1 TP31.1 | length 47.2
  Top Layer w1: L5.1@17.925,22.094 17.925,30.745 C47.1 TP31.1 TP31.1@29.67,35.32
  Bottom Layer w1: J9.2 20.874,31.549 20.874,33.694 C47.1
NetC59_2: C59.2 C63.1 J10.2 L7.1 TP36.1 | length 52.1
  Top Layer w1: L7.1@18.35,70.393 18.35,80.355 C63.1 ; C63.1@22.44,84.445 TP36.1
  Bottom Layer w1: J10.2 3.99,83.775 3.99,87.29 6.35,89.65 19.075,89.65 20.88,87.845 20.88,85.636 21.92,84.596 22.209,84.596 C63.1
NetC173_1: C173.1 C174.2 J47.1 R163.1 R164.1 TP104.1 VD26.1 VD28.1 | length 44.7
  Bottom Layer w1: R164.1@73.856,57.536 73.856,55.086 81.323,55.086 C173.1 82.023,55.586 TP104.1 C174.2 93.156,59.886 95.575,57.468 97.185,57.468 VD26.1 98.754,58.761 R163.1 101.283,55.461 J47.1@101.433,55.311
  Bottom Layer w2: J47.1@101.433,55.311 J47.1@106.513,55.311
NetC175_1: C175.1 C176.2 J48.1 R165.1 R166.1 TP105.1 VD27.1 VD29.1 | length 48.4
  Bottom Layer w1: R166.1@73.115,4.857 73.223,4.75 80.473,4.75 C175.1 80.73,4.642 VD29.1@84.17,8.082 ; R166.1@73.115,7.307 73.153,7.27 R166.1@73.153,4.857 ; VD29.1@84.17,8.092 C176.2 90.07,9.592 92.675,6.987 96.59,6.987 96.931,6.646 98.89,8.605 99.939,8.605 R165.1 100.884,8.607 101.47,8.022 J48.1@101.47,4.511 ; TP105.1 VD29.1
  Bottom Layer w2: J48.1@101.472,5.211 J48.1@106.552,5.211
NetC177_2: C177.2 R168.2 U38.5 | length 9.7
  Bottom Layer w0.6: R168.2 C177.2 47.456,71.538 47.556,71.438 47.556,70.873 47.908,70.522 52.771,70.522 53.02,70.771 U38.5
NetC178_2: C178.2 R167.2 U38.6 | length 5.1
  Bottom Layer w0.6: R167.2 C178.2 51.531,71.522 52.05,72.041 U38.6
NetC181_2: C181.2 R170.2 U39.5 | length 9.3
  Bottom Layer w0.6: R170.2 C181.2@45.795,21.903 ; C181.2 46.48,21.902 46.58,21.802 46.58,21.317 46.995,20.902 52.15,20.902 52.39,21.142 53.28,21.142 U39.5
NetC184_2: C184.2 R169.2 U39.6 | length 5.8
  Bottom Layer w0.6: R169.2@47.74,21.897 R169.2 50.095,21.897 C184.2 50.135,21.882 50.65,22.397 U39.6
NetC193_1: C193.1 C194.2 J53.1 R173.1 R174.1 TP108.1 VD30.1 VD32.1 | length 57.4
  Bottom Layer w0.4: J53.1@100.8,94.001 J53.1@100.821,93.98
  Bottom Layer w1: R174.1@68.356,83.861 68.356,86.311 68.356,90.011 68.381,90.036 68.556,90.211 68.556,92.339 70.437,94.22 71.759,94.22 VD32.1 73.223,94.264 C194.2 73.273,95.198 74.505,96.43 87.12,96.43 91.008,92.542 91.031,92.542 91.427,92.146 VD30.1@91.427,92.123 ; VD30.1 93.162,90.411 95.756,90.411 100.236,90.411 100.821,90.997 J53.1@100.821,93.98 ; R173.1 R173.1@100.704,90.505 ; J53.1@100.8,94.001 TP108.1
  Bottom Layer w2: J53.1@100.821,93.98 J53.1@105.901,93.98
NetC195_1: C195.1 C196.2 J54.1 R175.1 R176.1 TP109.1 VD31.1 VD33.1 | length 56.6
  Bottom Layer w1: C195.1 67.296,41.399 67.296,43.527 69.082,45.312 VD33.1 ; C195.1@67.388,41.362 67.388,36.836 67.388,33.965 R176.1@67.435,33.917 ; VD33.1@70.635,45.353 C196.2 72.14,46.266 73.949,48.075 87.629,48.075 VD31.1 91.551,44.152 R175.1@93.34,44.152 ; TP109.1 R175.1@93.34,44.152 ; J54.1@101.495,46.311 97.093,46.311 94.935,44.152 R175.1@93.34,44.152
  Bottom Layer w2: J54.1@101.495,46.311 J54.1@106.575,46.311
NetD24_1: D24.1 R155.1 U38.15 | length 47.5
  Bottom Layer w0.6: U38.15 65.181,66.961 65.43,66.712 68.605,66.712 70.581,64.736 ; D24.1@89.248,58.285 D24.1@89.251,58.282 ; R155.1@91.794,55.789 R155.1@91.898,55.686
  Bottom Layer w1: 70.581,64.736 70.581,55.036 72.717,52.9 86.352,52.9 89.248,55.796 D24.1@89.248,58.285 ; D24.1@89.251,58.282 90.647,58.282 91.794,57.134 R155.1@91.794,55.789 ; R155.1@91.898,55.686 R155.1@94.348,55.686
NetD24_2: D24.2 J45.1 R155.2 R163.2 TP102.1 VD26.2 | length 25.6
  Bottom Layer w0.6: VD26.2@97.275,62.259 VD26.2
  Bottom Layer w1: D24.2@89.248,62.285 89.323,62.211 VD26.2 98.773,60.761 R163.2 101.333,60.811 J45.1@101.333,63.986 ; J45.1@101.383,63.986 TP102.1
  Bottom Layer w2: J45.1@101.383,63.986 J45.1@106.463,63.986
NetD25_1: D25.1 R162.1 U39.15 | length 48.8
  Bottom Layer w0.6: U39.15 64.98,17.317 65.309,16.989 67.624,16.989 69.84,14.772
  Bottom Layer w1: 69.84,14.772 69.84,4.457 72.242,2.056 85.803,2.056 87.746,3.998 D25.1 87.879,7.459 89.51,7.459 90.581,6.387 90.581,5.117 90.806,4.892 R162.1@93.256,4.892
NetD25_2: D25.2 J46.1 R162.2 R165.2 TP103.1 VD27.2 | length 27.6
  Bottom Layer w1: D25.2@87.746,11.914 88.196,11.527 90.806,11.527 93.256,11.527 96.59,11.527 97.39,10.727 97.739,10.727 97.859,10.607 R165.2 101.001,10.607 101.47,11.076 101.47,14.136 101.503,14.168 TP103.1 101.503,19.078 TP103.1@101.535,19.111
  Bottom Layer w2: J46.1@101.445,13.661 J46.1@106.525,13.661
NetD26_1: D26.1 R171.1 U38.10 | length 38.4
  Bottom Layer w0.6: U38.10 65.625,73.311 65.874,73.56 68.68,73.56 72.581,77.461 ; D26.1@82.156,91.211 82.381,91.211 82.931,91.761 D26.1@82.931,92.161
  Bottom Layer w1: 72.581,77.461 72.581,87.575 73.167,88.161 79.106,88.161 D26.1@82.156,91.211 ; D26.1@83.131,92.136 86.056,92.136 R171.1@88.506,92.136
NetD26_2: D26.2 J49.1 R171.2 R173.2 TP106.1 VD30.2 | length 32.3
  Bottom Layer w0.4: J49.1@100.916,85.361 J49.1@101,85.277
  Bottom Layer w1: D26.2@83.106,88.161 83.106,87.761 84.881,85.986 85.831,85.986 86.056,85.761 86.056,85.586 88.106,85.586 90.356,85.586 VD30.2 93.181,88.411 95.756,88.411 100.321,88.411 100.906,87.825 J49.1@100.906,85.986 ; TP106.1 J49.1@101,85.277
  Bottom Layer w2: J49.1@100.916,85.361 J49.1@105.996,85.361
NetD27_1: D27.1 R172.1 U39.10 | length 39.3
  Bottom Layer w0.6: U39.10 64.842,23.667 65.127,23.953 68.625,23.953 71.835,27.162 ; D27.1@81.03,44.362 D27.1
  Bottom Layer w0.8: D27.1 D27.1@81.03,45.162
  Bottom Layer w1: 71.835,27.162 71.835,37.762 72.96,38.887 75.555,38.887 D27.1@81.03,44.362 ; D27.1@81.03,45.162 81.905,46.037 83.965,46.037 R172.1@86.415,46.037
NetD27_2: D27.2 J50.1 R172.2 R175.2 TP107.1 VD31.2 | length 31.4
  Bottom Layer w1: D27.2 81.03,40.362 81.905,39.487 83.965,39.487 86.415,39.487 88.751,39.487 89.22,39.956 89.22,40.002 91.37,42.152 R175.2@93.34,42.152 ; TP107.1 R175.2@93.34,42.152 ; J50.1@101.47,38.961 98.292,38.961 95.1,42.152 R175.2@93.34,42.152
  Bottom Layer w2: J50.1@101.47,38.961 J50.1@106.55,38.961
NetJ2_3: J2.3 R157.2 TP100.1 U36.2 | length 48.1
  Bottom Layer w0.4: R157.2 38.979,74.311 39.745,73.545 40.86,73.545 41.229,73.176 U36.2
  Bottom Layer w0.5: J2.3 6.628,56.19 14.813,64.375 27.975,64.375 32.656,69.056 TP100.1
  Bottom Layer w1: TP100.1 R157.2
NetJ2_5: J2.5 R156.2 TP98.1 U34.2 | length 56
  Bottom Layer w0.5: J2.5 6.91,49.25 15.225,49.25 18.475,46 25.675,46 33.812,37.863 33.812,26.169 ; TP98.1 31.342,26.169 33.812,26.169 ; U34.2 39.925,24.998 39.691,25.232 38.635,25.232 37.735,26.133 R156.2 37.474,26.169 33.812,26.169
NetJ3_2: J3.2 R159.2 TP99.1 U35.4 U39.1 | length 77.1
  Bottom Layer w0.4: J3.2 2.675,31.365 2.675,16.85 5.375,14.15 27,14.15 32.975,8.175 37.875,8.175 40.075,10.375 40.075,14.997 U35.4@40.47,15.392 ; U35.4 40.52,15.58 40.57,15.63 42.167,15.63 42.199,15.661 46.027,15.661 46.058,15.63 50.703,15.63 51.121,16.047 U39.1
NetJ3_3: J3.3 R158.2 TP93.1 U34.4 U35.2 U39.2 | length 84.4
  Top Layer w0.4: v1(39.275,27.144) 39.275,23.456 39.91,22.821 39.91,21.543 v1(39.87,21.503)
  Bottom Layer w0.4: J3.3 6.287,33.793 6.287,29.025 3.55,26.288 3.55,17.25 5.725,15.075 32.325,15.075 37.095,19.845 R158.2 ; U34.4 v1(39.275,27.144) ; v1(39.87,21.503) R158.2 ; U39.2 44.933,17.317 44.308,16.692 40.37,16.692 39.87,17.192 U35.2 39.87,19.503 R158.2
NetJ3_4: J3.4 R161.2 TP101.1 U37.4 U38.1 | length 64.9
  Top Layer w0.4: J3.4 8.582,38.195 26.312,55.925 v4(33.3,55.925)
  Bottom Layer w0.4: v4(33.3,55.925) 38.725,55.925 40.906,58.106 40.906,64.321 41.206,64.621 41.256,64.621 U37.4
  Bottom Layer w0.6: U37.4@41.269,64.833 43.169,64.833 43.181,64.821 43.214,64.853 47.199,64.853 TP101.1 51.863,64.886 52.668,65.691 U38.1
NetJ3_5: J3.5 R160.2 TP97.1 U36.4 U37.2 U38.2 | length 74.1
  Top Layer w0.4: J3.5 9.985,40.735 v4(33.025,63.775) ; v1(40.579,70.836) v1(40.579,75.436)
  Bottom Layer w0.4: v4(33.025,63.775) 36.829,63.775 38.129,65.075 38.129,68.174 39.493,69.538 R160.2@40.579,69.538 ; v1(40.579,70.836) R160.2@40.579,69.538 ; U36.4@40.579,74.591 v1(40.579,75.436) ; R160.2 R160.2@40.579,69.538 ; R160.2 U37.2 40.606,66.271 41.065,65.812 44.956,65.812 46.105,66.961 TP97.1
  Bottom Layer w0.6: TP97.1 U38.2
pads on no net: U38.7 U38.12 U38.13 U39.7 U39.12 U39.13

## Polygon pours and split planes (outlines as drawn)
GND on Bottom Layer "NONET_L-01_P-001" (solid, pour order 2): 28.1,44.413 28.1,41.35 32.675,36.775 32.675,33.841 28.1,29.266 28.1,7.575 54.67,7.575 54.67,44.413
GND on Bottom Layer "NONET_L-01_P-001" (solid, pour order 3): 28.39,97.725 28.39,90.71 32.965,86.135 32.965,82.803 28.39,78.228 28.39,54.3 54.96,54.3 54.96,97.725
GND on Top Layer "NONET_L-01_P-001" (solid, pour order 1): 28.1,44.413 28.1,41.35 32.675,36.775 32.675,33.841 28.1,29.266 28.1,7.575 54.67,7.575 54.67,44.413
GND on Top Layer "NONET_L-01_P-001" (solid, pour order 0): 28.39,97.725 28.39,90.71 32.965,86.135 32.965,82.803 28.39,78.228 28.39,54.3 54.96,54.3 54.96,97.725

## Keep-outs
Keep-Out Layer:
  circle w0.254: c105,75 r1.5
  circle w0.254: c5,95 r1.5
  circle w0.254: c5,5 r1.5
  circle w0.254: c105,25 r1.5
  lines w0.254: 0,95 cw(c5,95) 5,100 105,100 cw(c105,95) 110,95 110,5 cw(c105,5) 105,0 5,0 cw(c5,5) 0,5 0,95.328

## Other copper
Top Layer:
  rectangle net GND: 42.05,42.45 49.35,56.375

## Silkscreen, mask and mechanical layers (free items; w line width, h text height)
Top Overlay:
  circle w1: c105,75 r2.2
  circle w1: c5,95 r2.2
  circle w1: c5,5 r2.2
  circle w1: c105,25 r2.2
  text "GND +5V" at 38.45,98.375 h1
  text "E" at 96.256,93.042 h2
  text "GND VCC" at 0.775,87.158 h1 r270
  text "G" at 96.256,84.327 h2
  text "G" at 96.623,62.895 h2
  text "5V" at 8.854,60.749 h0.8
  text "GND" at 8.854,58.436 h0.8
  text "IN_1" at 8.854,56.029 h0.8
  text "E" at 96.85,54.45 h2
  text "GND" at 8.854,53.356 h0.8
  text "IN_2" at 8.875,50.949 h0.8
  text "GND" at 8.875,48.276 h0.8
  text "E" at 96.7,45.325 h2
  text "GND" at 8.683,42.981 h0.7
  text "4_2_INV" at 8.46,40.553 h0.7
  text "4_2_STR" at 8.429,38.146 h0.7
  text "G" at 96.35,37.875 h2
  text "2_2_INV" at 8.529,35.478 h0.7
  text "2_2_STR" at 8.529,32.938 h0.7
  text "5V" at 9.179,30.129 h0.8
  text "GND VCC" at 0.825,22.875 h1 r270
  text "G" at 96.596,12.886 h2
  text "E" at 96.231,4.06 h2